# Altium PCB Electrode_PCB_v4.0.2.PcbDoc
Units mil, origin at the board's own origin, x right, y up, seen from the top; angles counter-clockwise.
Board outline 510.49 x 1258.83 mil, 2 copper layers (Top Layer, Bottom Layer), stack 34 mil thick; 24 components, 17 nets, 61 pads, 12 vias.
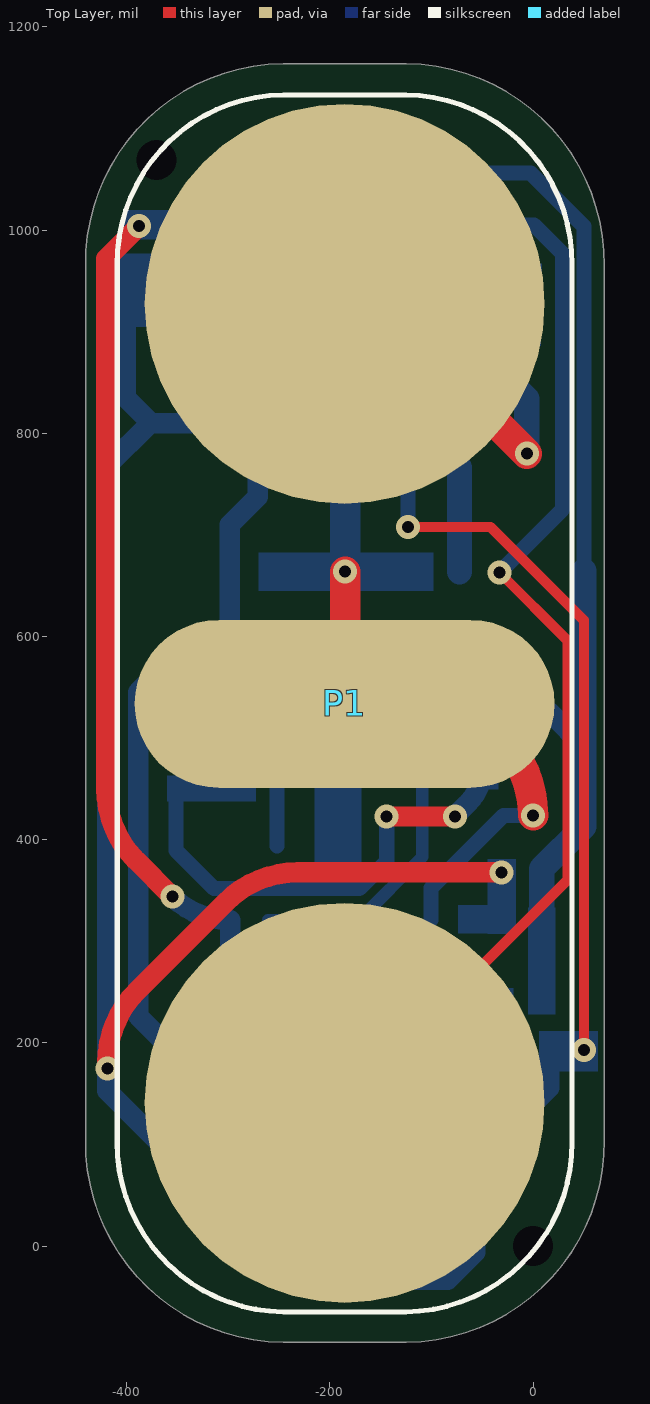
[diagram p0: Top Layer view]
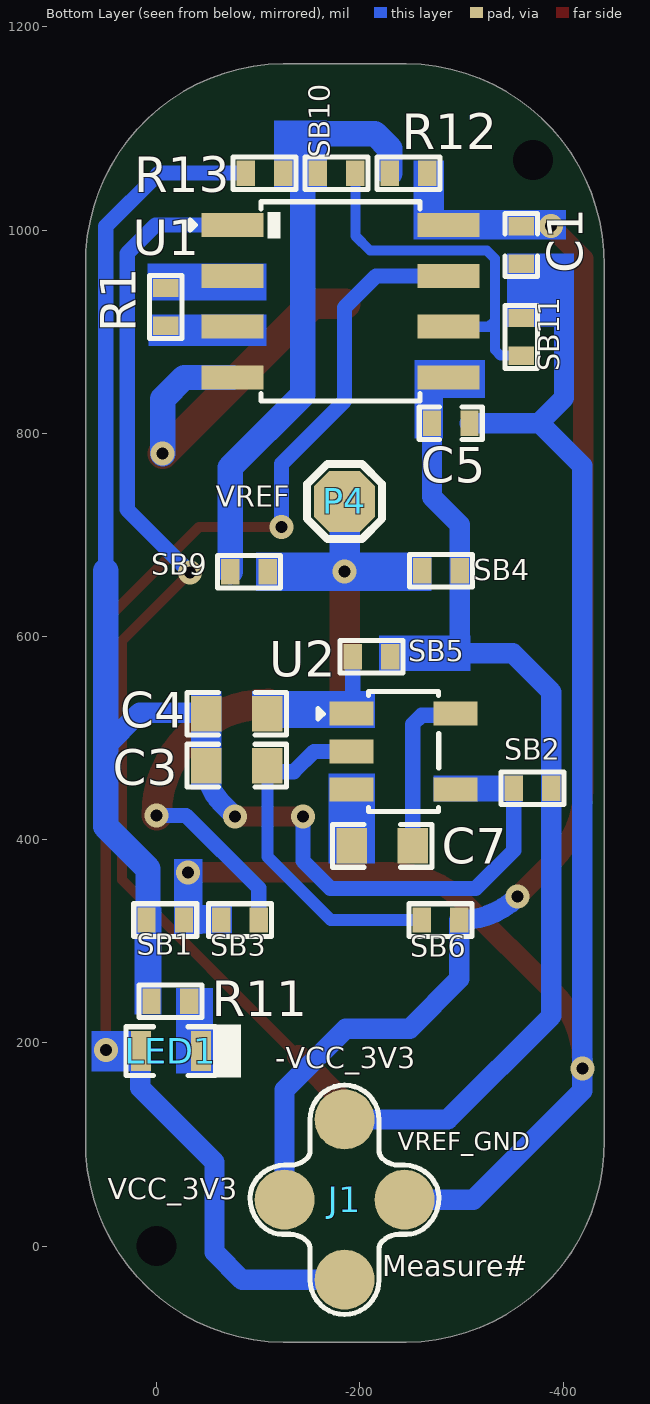
[diagram p1: Bottom Layer view, seen from below]
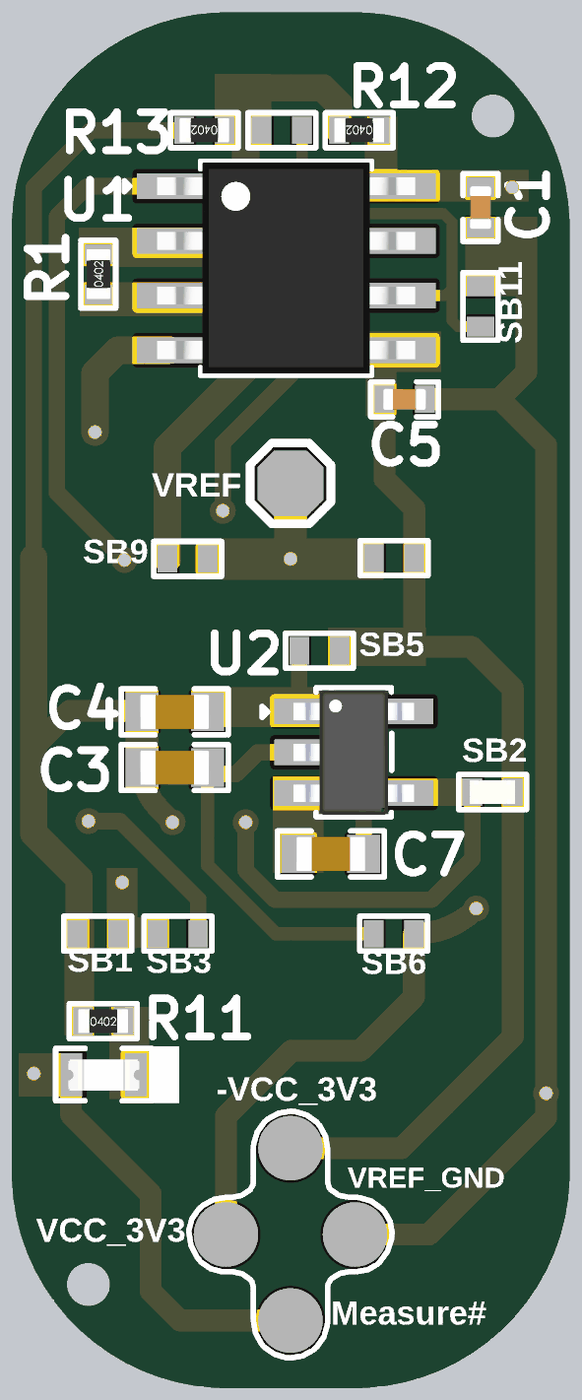
[diagram p2: 3D render of the assembled board from below, using the file's embedded part models]

## Layer stack, top to bottom
Top Solder: solder mask 3, Solder Resist, Dk 3.5
Top Layer: signal copper 9
Dielectric 1: dielectric 16, FR-4, Dk 4.8
Bottom Layer: signal copper 9
Bottom Solder: solder mask 3, Solder Resist, Dk 3.5

## Board outline
-440.49,104.27 ccw(c-243.65,102.06) -245.86,-94.78 -124.63,-94.78 ccw(c-126.84,102.06) 70,104.27 70,965 ccw(c-126.84,967.21) -124.63,1164.05 -245.86,1164.05 ccw(c-243.65,967.21) -440.49,965

## Design rules (kind name [scope] priority, off if disabled: settings)
Clearance [All] p1: gap=6 ignorepadtopadclearanceinfootprint=FALSE except(4: Arc-SMDPad Track-SMDPad SMDPad-SMDPad)
ComponentClearance [All] p1: gap=6 collisioncheckmode=3 verticalgap=6 showdistances=FALSE
HoleSize [All] p1: absolutevalues=TRUE maxlimit=1000 minlimit=1 maxpercent=80.000 minpercent=20.000
HoleToHoleClearance [All] p1: gap=0 allowstackedmicrovias=TRUE
MinimumSolderMaskSliver [All] p1: minsoldermaskwidth=0
PolygonConnect [All] p1: connectstyle=Relief reliefconductorwidth=10 reliefentries=4 polygonreliefangle="90 Angle" airgapwidth=10
RoutingVias [All] p1: holewidth=11.81 width=23.62 viastyle="Through Hole" minholewidth=11.81 minwidth=23.62 maxholewidth=31.5 maxwidth=62.99
SilkToSilkClearance [All] p1: silktosilkclearance=0
SilkToSolderMaskClearance [IsPad] p1: minsilkscreentomaskgap=0 clearancetoexposedcopper=TRUE
SolderMaskExpansion [All] p1: expansion=4 istentingtop=FALSE
UnRoutedNet [All] p1: checkbadconnections=TRUE
Width [All] p1: maxlimit=40 minlimit=6 preferedwidth=22 minimp=50.000000 maximp=50.000000 favimp=50.000000
23 further rules are at their usual default settings.

## Components (designator, comment, footprint, x,y, rotation, side; value= is the part's Value field where it differs from the comment)
C1 "1uF" Cap-0402 -359,985.5 r270 bottom locked
C3 "10uF" Cap-0603 -79,473 r180 bottom locked
C4 "10uF" Cap-0603 -79,524 r180 bottom locked
C5 "1uF" Cap-0402 -289.5,810 r180 bottom locked
C7 "10uF" Cap-0603 -222,394 r0 bottom locked
J1 "2x2 Pad" "2x2 Pad" -185,45.74 r0 bottom locked
LED1 "Orange" LED-0603 -14,192 r180 bottom locked
P1 "sEMG sensor" SEMG-SENSOR -185.49,534.27 r0 top locked
P4 "Test Point" Test-point -185,733 r0 bottom locked
R1 "240R" RES-0402 -9,924.5 r90 bottom locked
R11 "1K" RES-0402 -13.5,241 r180 bottom
R12 "150K" Res-0402 -248,1056.22 r0 bottom locked
R13 "150K" Res-0402 -106.18,1056.22 r0 bottom locked
SB1 "Solder Bridge 0402" "Solder Bridge 0402" -8.5,321 r0 bottom
SB2 "Solder Bridge 0402" "Solder Bridge 0402" -370,450.57 r0 bottom locked
SB3 "Solder Bridge 0402" "Solder Bridge 0402" -82,321 r0 bottom
SB4 "Solder Bridge 0402" "Solder Bridge 0402" -279.87,664.76 r180 bottom locked
SB5 "Solder Bridge 0402" "Solder Bridge 0402" -211.5,580 r180 bottom locked
SB6 "Solder Bridge 0402" "Solder Bridge 0402" -279.5,321 r0 bottom locked
SB9 "Solder Bridge 0402" "Solder Bridge 0402" -90.89,664 r0 bottom locked
SB10 "Solder Bridge 0402" "Solder Bridge 0402" -177.09,1056.22 r180 bottom locked
SB11 "Solder Bridge 0402" "Solder Bridge 0402" -359,895 r270 bottom locked
U1 "AD8221ARZ-R7" SOIC-8 -180.98,930 r180 bottom locked
U2 "SGM3207YN5G/TR" SOT-23-5 -243,487 r180 bottom locked

## Footprints (in the part's own frame and the unit in brackets; to place one, negate y for a bottom-side part, rotate by r counter-clockwise, add the part's x,y. Pads: shape width x height; smd on the part's side, far side on the other; paste and mask are expansions set on the pad)
"2x2 Pad" [mm]
  round 1.5 smd paste+0 mask+0.055: 1(-1.5,0) 2(0,-2.007) 3(1.5,0) 4(0,2)
  silkscreen extent -2.36,-2.87 2.36,2.87
Cap-0402 [mil]
  rect 18x25 smd mask+2.36: 1(-18.5,0) 2(18.5,0)
  silkscreen extent -31,-16 31,16, body extent -20,-10 20,10, height 19
Cap-0603 [mil]
  rect 30x35 smd mask+2.36: 1(-30,0) 2(30,0)
  silkscreen extent -49,-21 49,21, body extent -32,-16 31,16, height 34
LED-0603 [mm]
  rect 0.5x1 smd: 1(-0.75,0) 2(0.75,0)
  silkscreen extent -1.12,-0.66 1.75,0.66, body extent -0.82,-0.37 0.82,0.36, height 0.68
RES-0402 [mil]
  rect 18x25 smd mask+2.17: 1(-18.5,0) 2(18.5,0)
  silkscreen extent -32,-17 32,16, body extent -23,-11 23,11, height 16
Res-0402 [mil]
  rect 18x25 smd mask+2.17: 1(-18.5,0) 2(18.5,0)
  silkscreen extent -32,-17 32,16, body extent -23,-11 23,11, height 16
SEMG-SENSOR [mm]
  round 10 smd: 1(0,9.987) 2(0,-9.987)
  oval 10.5x4.2 smd: 3(0,-0.013)
  silkscreen extent -5.68,-15.21 5.68,15.21
SOIC-8 [mm]
  rect 1.55x0.6 smd: 1(-2.7,1.905) 2(-2.7,0.635) 3(-2.7,-0.635) 4(-2.7,-1.905) 5(2.7,-1.905) 6(2.7,-0.635) 7(2.7,0.635) 8(2.7,1.905)
  silkscreen extent -3.76,-2.49 1.99,2.49, body extent -3,-2.45 3,2.45, height 1.7
"Solder Bridge 0402" [mil]
  rect 18x25 smd mask+2.17: 1(-18.5,0) 2(18.5,0)
  silkscreen extent -32,-17 32,16
SOT-23-5 [mm]
  rect 1.1x0.6 smd: 1(-1.3,0.95) 2(-1.3,0) 3(-1.3,-0.95) 4(1.3,-0.95) 5(1.3,0.95)
  silkscreen extent -2.13,-1.5 0.88,1.5, body extent -1.4,-1.45 1.4,1.45, height 1.45
Test-point [mil]
  oct 60x60 smd: 1(0,0)
  silkscreen extent -37,-37 37,37

## Part data
C1 C5: library part CC0402KRX5R7BB105, "CAP CER 1UF 16V X5R 0402", Case Code (Imperial)=0402, Case Code (Metric)=1005, Dielectric=X5R, LCSC Part Number=C325464, MANUFACTURER=Yageo, Max Operating Temperature=85°C, Min Operating Temperature=-55°C, Supplier Part Number 1=311-1691-6-ND, Tolerance=10%, Voltage Rating=16V, Capacitance=1uF, Case/Package=0402, ComponentLink1Description=http://www.yageo.com/documents/recent/UPY-GPHC_X5R_4V-to-50V_12.pdf?src-supplier=Avnet+Europe, ComponentLink1URL=http://www.yageo.com/documents/recent/UPY-GPHC_X5R_4V-to-50V_12.pdf?src-supplier=Avnet+Europe, Composition=Ceramic, Depth=0.5mm, Halogen Free="Halogen Free", Height=0.5mm, Item Type=Capacitor, Lead Free="Lead Free", Length=1mm, Manufacturer Part Number=CC0402KRX5R7BB105, Mount="Surface Mount", Packaging="Tape and Reel", Pricing 1="1=0.36, 10=0.252, 100=0.1512, 500=0.1134, 1000=0.09576, 2500=0.09072, 5000=0.08568 (USD)", Radiation Hardening=No, Stock 1=1405667, Supplier 1=Digi-Key, Termination=SMD/SMT, Thickness=0.022inch, Voltage Rating (DC)=16V, Weight=2.3E-05oz, Width=0.02inch
C3 C4 C7: library part CL10A106MA8NRNC, "CAP CER 10UF 25V X5R 0603", Case Code (Imperial)=0603, Case Code (Metric)=1608, Dielectric=X5R, LCSC Part Number=C96446, MANUFACTURER=Samsung, Max Operating Temperature=85°C, Min Operating Temperature=-55°C, Package Quantity=1, Tolerance=20%, Voltage Rating=25V, Capacitance=10uF, Case/Package=0603, Category="Ceramic Capacitors", ComponentLink1Description=https://datasheet.ciiva.com/25766/cl10a106ma8nrnc-25766562.pdf?src-supplier=Digi-Key, ComponentLink1URL=https://datasheet.ciiva.com/25766/cl10a106ma8nrnc-25766562.pdf?src-supplier=Digi-Key, Construction=Flat, Contact Plating=Tin, Lead Free="Lead Free", Length=0.063inch, Manufacturer Part Number=CL10A106MA8NRNC, Mount="Surface Mount", Packaging="Tape and Reel", Pricing 1="4000=0.03753, 8000=0.03700, 16000=0.03595, 24000=0.03515, 32000=0.03383, 40000=0.03304, 400000=0.03225 (USD)", RoHS=Yes, RoHS Compliant=Yes, Series=CL, Supplier 1=Avnet, Supplier Part Number 1=CL10A106MA8NRNC, Termination=Wraparound, Thickness=0.035inch, Width=0.031inch
J1: "Wire Connecting Pad"
LED1: library part 19-217/S2C-AQ1R1B/3T, "0603(H=0.4mm) λD=600.5~612.5nm VR=5V VF=1.7V~2.2V IF=25mA PD=60mW", LCSC Part Number=C146215, MANUFACTURER=Everlight, Supplier Part Number 1=1080-19-217/S2C-AQ1R1B/3TTR-ND, Category=LEDs, ComponentLink1Description=LCSC, ComponentLink1URL=https://www.lcsc.com/product-detail/Light-Emitting-Diodes-LED_Everlight-Elec-19-217-S2C-AQ1R1B-3T_C146215.html, Item Type=LED, Manufacturer Part Number=19-217/S2C-AQ1R1B/3T, RoHS=No, Supplier 1=Digi-Key
P1: library part "SEMG Sensor", "Sensor Connecting Pads"
P4: library part "TEST POINT", "Test Point ON", Item Type="TEST POINT"
R1: library part RC0402FR-07240RL, "RES 240 OHM 1% 1/16W 0402", Case Code (Imperial)=0402, Case Code (Metric)=1005, MANUFACTURER=Yageo, Max Operating Temperature=155°C, Max Power Dissipation=63mW, Min Operating Temperature=-55°C, Package Quantity=1, Resistance Tolerance=1%, Resistor Type="Thick Film", Supplier Part Number 1=603-RC0402FR-07240RL, Temperature Coefficient=100ppm/°C, Voltage Rating=50V, Case/Package=0402, Category="Chip SMD Resistors", ComponentLink1Description=https://datasheet.ciiva.com/7849/1018594-7849915.pdf?src-supplier=Element14, ComponentLink1URL=https://datasheet.ciiva.com/7849/1018594-7849915.pdf?src-supplier=Element14, ComponentLink2Description=https://datasheet.ciiva.com/7849/1018594-7849916.pdf?src-supplier=Element14, ComponentLink2URL=https://datasheet.ciiva.com/7849/1018594-7849916.pdf?src-supplier=Element14, ComponentLink3Description=https://datasheet.ciiva.com/2519/pyu-r-int-thick-7-2519157.pdf?src-supplier=Digi-Key, ComponentLink3URL=https://datasheet.ciiva.com/2519/pyu-r-int-thick-7-2519157.pdf?src-supplier=Digi-Key, ComponentLink4Description=https://datasheet.ciiva.com/2519/pyu-r-int-thick-7-2519158.pdf?src-supplier=Digi-Key, ComponentLink4URL=https://datasheet.ciiva.com/2519/pyu-r-int-thick-7-2519158.pdf?src-supplier=Digi-Key, ComponentLink5Description=https://datasheet.ciiva.com/2519/pyu-r-int-thick-7-2519156.pdf?src-supplier=Digi-Key, ComponentLink5URL=https://datasheet.ciiva.com/2519/pyu-r-int-thick-7-2519156.pdf?src-supplier=Digi-Key, ComponentLink6Description=https://datasheet.ciiva.com/12669/pyu-rc0402-51-rohs-l-6-r-12669689.pdf?src-supplier=Mouser, ComponentLink6URL=https://datasheet.ciiva.com/12669/pyu-rc0402-51-rohs-l-6-r-12669689.pdf?src-supplier=Mouser, ComponentLink7Description=https://datasheet.ciiva.com/17419/pyu-rc0402-51-rohs-l-6-r-17419482.pdf?src-supplier=Future+Electronics, ComponentLink7URL=https://datasheet.ciiva.com/17419/pyu-rc0402-51-rohs-l-6-r-17419482.pdf?src-supplier=Future+Electronics, Construction=Rectangular, Depth=0.5mm, Features="Moisture Resistant", Height=0.016inch, Lead Free="Lead Free", Length=1mm, Manufacturer Part Number=RC0402FR-07240RL, Military Standard=Not, Number of Terminations=2, Packaging="Tape and Reel", Power Rating=63mW, Pricing 1="1=0.10000, 10=0.01200, 50=0.01200, 100=0.00500, 1000=0.00300, 10000=0.00100 (USD)", REACH SVHC=Unknown, Resistance=240R, RoHS=Yes, RoHS Compliant=Yes, Series=RC, Size Code=0402, Stock 1=1903202, Supplier 1=Mouser, Termination=SMD/SMT, Tolerance=1%, Voltage Rating (DC)=50V, Width=0.02inch
R11: library part RC0402JR-071KL, "RES 1K OHM 5% 1/16W 0402", Case Code (Imperial)=0402, Case Code (Metric)=1005, LCSC Part Number=C105637, MANUFACTURER=Yageo, Max Operating Temperature=155°C, Max Power Dissipation=63mW, Min Operating Temperature=-55°C, Package Quantity=1, Power Rating=62.5mW, Resistance=1kR, Resistance Tolerance=5%, Resistor Type="Thick Film", Supplier Part Number 1=311-1.0KJRCT-ND, Temperature Coefficient=100ppm/°C, Voltage Rating=50V, Case/Package=0402, Category="Chip SMD Resistors", ComponentLink1Description=https://datasheet.ciiva.com/7983/1018594-7983558.pdf?src-supplier=Element14, ComponentLink1URL=https://datasheet.ciiva.com/7983/1018594-7983558.pdf?src-supplier=Element14, ComponentLink2Description=https://datasheet.ciiva.com/2452/pyu-r-int-thick-7-2452756.pdf?src-supplier=Digi-Key, ComponentLink2URL=https://datasheet.ciiva.com/2452/pyu-r-int-thick-7-2452756.pdf?src-supplier=Digi-Key, ComponentLink3Description=https://datasheet.ciiva.com/2452/pyu-r-int-thick-7-2452757.pdf?src-supplier=Digi-Key, ComponentLink3URL=https://datasheet.ciiva.com/2452/pyu-r-int-thick-7-2452757.pdf?src-supplier=Digi-Key, ComponentLink4Description=https://datasheet.ciiva.com/2452/pyu-r-int-thick-7-2452755.pdf?src-supplier=Digi-Key, ComponentLink4URL=https://datasheet.ciiva.com/2452/pyu-r-int-thick-7-2452755.pdf?src-supplier=Digi-Key, ComponentLink5Description=https://datasheet.ciiva.com/7850/1018594-7850170.pdf?src-supplier=Element14, ComponentLink5URL=https://datasheet.ciiva.com/7850/1018594-7850170.pdf?src-supplier=Element14, ComponentLink6Description=https://datasheet.ciiva.com/7850/1018594-7850171.pdf?src-supplier=Element14, ComponentLink6URL=https://datasheet.ciiva.com/7850/1018594-7850171.pdf?src-supplier=Element14, ComponentLink7Description=https://datasheet.ciiva.com/17081/pyu-rc0402-51-rohs-l-6-r-17081438.pdf?src-supplier=Future+Electronics, ComponentLink7URL=https://datasheet.ciiva.com/17081/pyu-rc0402-51-rohs-l-6-r-17081438.pdf?src-supplier=Future+Electronics, Construction=Rectangular, Depth=0.5mm, Features="Moisture Resistant", Height=0.016inch, Item Type=Resistor, Lead Free="Lead Free", Length=0.039inch, Manufacturer Part Number=RC0402JR-071KL, Military Standard=Not, Number of Terminations=2, Packaging="Tape and Reel", Pricing 1="1=0.10000, 10=0.01300, 100=0.00540, 1000=0.00244, 2500=0.00212, 5000=0.00175 (USD)", REACH SVHC="No SVHC", RoHS=Yes, RoHS Compliant=Yes, Series=RC, Size Code=0402, Stock 1=452315, Supplier 1=Digi-Key, Termination=SMD/SMT, Tolerance=5%, Width=0.02inch
R12 R13: library part RC0402JR-07150KL, "RES SMD 0402 150kOhm 5% Paper T/R", Case Code (Imperial)=0402, Case Code (Metric)=1005, LCSC Part Number=C137919, MANUFACTURER=Yageo, Max Operating Temperature=155°C, Max Power Dissipation=63mW, Min Operating Temperature=-55°C, Package Quantity=1, Resistance=150kR, Resistance Tolerance=5%, Resistor Type="Thick Film", Temperature Coefficient=100ppm/°C, Voltage Rating=50V, Case/Package=0402, Category="Chip SMD Resistors", ComponentLink1Description=https://datasheet.ciiva.com/7983/1018594-7983551.pdf?src-supplier=Element14, ComponentLink1URL=https://datasheet.ciiva.com/7983/1018594-7983551.pdf?src-supplier=Element14, ComponentLink2Description=https://datasheet.ciiva.com/2518/pyu-r-int-thick-7-2518929.pdf?src-supplier=Digi-Key, ComponentLink2URL=https://datasheet.ciiva.com/2518/pyu-r-int-thick-7-2518929.pdf?src-supplier=Digi-Key, ComponentLink3Description=https://datasheet.ciiva.com/2518/pyu-r-int-thick-7-2518930.pdf?src-supplier=Digi-Key, ComponentLink3URL=https://datasheet.ciiva.com/2518/pyu-r-int-thick-7-2518930.pdf?src-supplier=Digi-Key, ComponentLink4Description=https://datasheet.ciiva.com/2518/pyu-r-int-thick-7-2518928.pdf?src-supplier=Digi-Key, ComponentLink4URL=https://datasheet.ciiva.com/2518/pyu-r-int-thick-7-2518928.pdf?src-supplier=Digi-Key, ComponentLink5Description=https://datasheet.ciiva.com/7850/1018594-7850149.pdf?src-supplier=Element14, ComponentLink5URL=https://datasheet.ciiva.com/7850/1018594-7850149.pdf?src-supplier=Element14, ComponentLink6Description=https://datasheet.ciiva.com/17072/pyu-rc0402-51-rohs-l-6-r-17072379.pdf?src-supplier=Future+Electronics, ComponentLink6URL=https://datasheet.ciiva.com/17072/pyu-rc0402-51-rohs-l-6-r-17072379.pdf?src-supplier=Future+Electronics, ComponentLink7Description=https://datasheet.ciiva.com/15189/getdatasheetpartid-251830-15189543.pdf?src-supplier=Verical, ComponentLink7URL=https://datasheet.ciiva.com/15189/getdatasheetpartid-251830-15189543.pdf?src-supplier=Verical, Construction=Rectangular, Depth=0.5mm, Features="Moisture Resistant", Height=0.016inch, Item Type=Resistor, Lead Free="Lead Free", Length=1mm, Manufacturer Part Number=RC0402JR-07150KL, Military Standard=Not, Number of Terminations=2, Packaging="Tape and Reel", Power Rating=63mW, Pricing 1="10000=0.00100 (USD)", REACH SVHC="No SVHC", RoHS=Yes, RoHS Compliant=Yes, Series=RC, Size Code=0402, Stock 1=170000, Supplier 1="Arrow Electronics", Supplier Part Number 1=RC0402JR-07150KL, Termination=SMD/SMT, Tolerance=5%, Weight=2.3E-05oz, Width=0.02inch
SB1 SB2 SB3 SB4 SB5 SB6 SB9 SB10 SB11: "Solder Bridge ON"
  SB5 SB6 SB9 SB10 SB11: Item Type="Solder Bridge", Manufacturer Part Number="Solder Bridge 0402"
U1: "IC OPAMP INSTR 825KHZ 8SOIC", Case/Package=SOIC, Input Bias Current=1.5nA, Input Offset Voltage (Vos)=60uV, Input Resistance=100GR, LCSC Part Number=C13342, MANUFACTURER="Analog Devices", Max Dual Supply Voltage=18V, Max Operating Temperature=85°C, Max Power Dissipation=200mW, Min Dual Supply Voltage=2.3V, Min Operating Temperature=-40°C, Nominal Supply Current=1mA, Operating Supply Voltage=36V, Output Current per Channel=18mA, Package Quantity=1000, Power Supply Rejection Ratio (PSRR)=130dB, Quiescent Current=900uA, Supplier Part Number 1=584-AD8221ARZ-R7, Voltage Gain=60dB, -3db Bandwidth=825kHz, Bandwidth=562kHz, Category="Amplifiers - Op Amps, Buffer, Instrumentation", Common Mode Rejection Ratio=80dB, ComponentLink1Description=https://datasheet.ciiva.com/15128/getdatasheetpartid-313520-15128733.pdf?src-supplier=Verical, ComponentLink1URL=https://datasheet.ciiva.com/15128/getdatasheetpartid-313520-15128733.pdf?src-supplier=Verical, ComponentLink2Description=https://datasheet.ciiva.com/2975/ad8221-2975658.pdf?src-supplier=Avnet, ComponentLink2URL=https://datasheet.ciiva.com/2975/ad8221-2975658.pdf?src-supplier=Avnet, ComponentLink3Description=https://datasheet.ciiva.com/2975/ad8221-2975980.pdf?src-supplier=Avnet, ComponentLink3URL=https://datasheet.ciiva.com/2975/ad8221-2975980.pdf?src-supplier=Avnet, ComponentLink4Description=https://datasheet.ciiva.com/6628/ad8221-6628618.pdf?src-supplier=Digi-Key, ComponentLink4URL=https://datasheet.ciiva.com/6628/ad8221-6628618.pdf?src-supplier=Digi-Key, ComponentLink5Description=https://datasheet.ciiva.com/6628/ad8221-6628619.pdf?src-supplier=Digi-Key, ComponentLink5URL=https://datasheet.ciiva.com/6628/ad8221-6628619.pdf?src-supplier=Digi-Key, ComponentLink6Description=https://datasheet.ciiva.com/6628/ad8221-6628617.pdf?src-supplier=Digi-Key, ComponentLink6URL=https://datasheet.ciiva.com/6628/ad8221-6628617.pdf?src-supplier=Digi-Key, ComponentLink7Description=https://datasheet.ciiva.com/48709/001249009-da-01-en-ic-amp-inst-prec-ad8221arz-r7-soic-8-adi-48709526.pdf?src-supplier=Conrad, ComponentLink7URL=https://datasheet.ciiva.com/48709/001249009-da-01-en-ic-amp-inst-prec-ad8221arz-r7-soic-8-adi-48709526.pdf?src-supplier=Conrad, Contact Plating=Tin,Matte, Item Type=IC, Lead Free="Contains Lead", Manufacturer Part Number=AD8221ARZ-R7, Number of Channels=1, Number of Circuits=1, Number of Elements=1, Number of Pins=8, Operating Supply Current=1mA, Packaging="Tape and Reel", Power Dissipation=200mW, Pricing 1="1=7.37000, 10=6.66000, 25=6.35000, 50=6.35000, 100=5.51000, 250=5.27000, 500=4.80000, 1000=4.37000, 10000=4.37000 (USD)", Radiation Hardening=No, RoHS=Yes, RoHS Compliant=Yes, Series=-, Slew Rate=2.5V/µs, Supplier 1=Mouser, Supply Current=1mA
U2: "NO Charge pump 1 -5.5V~-1.4V 1.4V~5.5V 60mA 19kHz SOT-23-5 DC-DC Converters ROHS", LCSC Part Number=C80403, MANUFACTURER="SG Micro", Category=Uncategorized, Item Type=IC, Manufacturer Part Number=SGM3207YN5G/TR, Pricing 1="3000=0.38750, 6000=0.36250, 12000=0.33750, 18000=0.32500, 24000=0.31250, 30000=0.31250, 300000=0.30500 (USD)", RoHS=No, Supplier 1=Avnet, Supplier Part Number 1=SGM3207YN5G/TR

## Free pads (board coordinates)
  round 0 hole 39.37 unplated: MH1(-370.49,1069.27) MH2(0,0)

## Via types
v1: diameter 23.62, hole 11.81, Top Layer to Bottom Layer, tented both sides, 12 vias

## Nets (pads, with @x,y where several pads share a name; then routed paths per layer and width w, separated by ;. In a path a pad name is that pad's centre, name@x,y a point inside that pad or via, vN(x,y) a via of type N, cw(c..) or ccw(c..) an arc to the next point about the centre after c; other vN are vias at no path point)
#rg: R1.2 U1.2
*rg: R1.1 U1.3
-VCC_3V3: C5.1 J1.2 SB2.1 SB4.2 SB5.2 U1.5 | length 980.2
  Bottom Layer w20: -298.37,580 -298.37,663.7 -298.37,710.09 -271,737.46 C5.1 ; -263.97,580 SB5.2 ; -263.97,583.5 -298.37,583.5 -350.5,583.5 -388.5,545.5 SB2.1 -388.5,265.5 -388.5,226.5 -286.74,124.74 J1.2
CAP+: C7.1 U2.5 | length 166.3
  Bottom Layer w15: U2.5 -292.29,522.51 -260.79,522.51 -252,513.72 C7.1
CAP-: C7.2 U2.3
END: P1.1 U1.4 | length 371.9
  Top Layer w30: P1.1 -153.46,927.46 v1(-6,780)
  Bottom Layer w25: U1.4 -27,855 -6,834 v1(-6,780)
GND: C3.1 C4.1 R11.1 R13.2 SB1.2 SB2.2 U2.4 | length 1674.4
  Top Layer w20: v1(-144,423) v1(-77,423)
  Bottom Layer w10: SB2.2 SB2.2@-351,450.07
  Bottom Layer w15: SB2.2 -351.5,389.5 -314,352 -171,352 -144,379 v1(-144,423) ; R13.2 -2.35,1056.22 -1.1,1054.97 50.12,1003.75 50.12,491.75 ; v1(-77,423) v1@-75.35,424.65 ; C3.1@-56.5,457 -49,464.5 C3.1@-49,467 ; C4.1@-49,529 C4.1@-47.75,527.75 ; 8,285.5 8,292.5
  Bottom Layer w20: v1@-75.35,424.65 -64.55,435.45 ccw(c-102.11,473) -49.83,463.67 ccw(c-102.11,473) C3.1 ; C4.1 -48,525 16.87,525 50.12,491.75
  Bottom Layer w25: 8.5,280.75 8.5,371.5 50.12,413.12 50.12,491.75 50.12,664.88
Measure#: J1.4 LED1.1 U1.7 | length 1370.6
  Top Layer w10: v1(-123,708) -42,708 50,616 v1(50,193)
  Bottom Layer w15: U1.7 -216,955.01 -185,924.01 -185,832.01 ; -185,844.3 -185,832.01 ; v1(-123,708) -123,770.01 -185,832.01
  Bottom Layer w20: J1.4 -84,-33 -57,-6 -57,82.79 16,155.79 LED1.1@16,192
MID: P1.2 U1.1 | length 1095.6
  Top Layer w10: P1.2@-139.56,187 34,360.56 34,596 v1(-33,663)
  Top Layer w22: P1.2 P1.2@-139.56,187
  Bottom Layer w15: U1.1 1,1005 29,977 29,725 v1(-33,663)
NetC3_2: C3.2 SB6.2 U2.2 | length 352.6
  Bottom Layer w12: SB6.2 -171.37,321 -109,383.37 -109,430 C3.2@-109,467
  Bottom Layer w15: U2.2 -155,487 -135,467 C3.2@-109,467
NetC4_2: C4.2 SB5.1 U2.1 | length 56.1
  Bottom Layer w6: U2.1@-193,525.58 U2.1
  Bottom Layer w15: U2.1@-193,525.58 SB5.1
NetLED1_2: LED1.2 R11.2 | length 41
  Bottom Layer w15: LED1.2 -43.53,232.97
NetSB10_2: SB10.2 SB11.2 U1.6 | length 375
  Bottom Layer w10: SB11.2 -338.5,876.5 -333,882 -333,911 ; U1.6 -327,905 -333,911 ; SB10.2 -195.59,994.41 -210,980 -246.98,980 -325,980 -333,972 -333,911
VCC/2: R12.2 R13.1 SB9.2 SB10.1 | length 519.8
  Bottom Layer w25: R12.2 -229.5,1080.36 -214.86,1095 -160.06,1095 ; -144,1054.5 -144,838 -72.39,766.39 SB9.2
VCC_3V3: C1.1 J1.3 R12.1 SB6.1 U1.8 | length 1161.6
  Top Layer w20: v1(-388,1004) -420,972 -420,450.42 ccw(c-320,450.42) -390.71,379.71 v1(-355,344)
  Bottom Layer w6: U1.8@-305.98,1005 U1.8 U1.8@-287,1005.28
  Bottom Layer w20: v1(-355,344) ccw(c-299.47,399.53) -299.47,321 SB6.1 -298,263 -249,214 -186,214 -125.94,153.94 J1.3
VREF: P1.3 P4.1 SB3.1 SB4.1 SB9.1 | length 761.9
  Top Layer w15: P1.3 P1.3@-185,534.25
  Top Layer w25: P1.3 P1.3@-109.76,533.76
  Top Layer w30: P1.3@-185,534.25 v1(-185,664) ; P1.3@-109.76,533.76 cw(c-109.76,424) v1(0,424)
  Bottom Layer w6: SB4.1 SB4.1@-260.61,664 ; -124.47,664 -124.17,663.7
  Bottom Layer w15: SB4.1@-260.61,664 v1(-185,664) -124.47,664 SB9.1 ; SB3.1 -100.5,352.5 -29,424 v1(0,424)
  Bottom Layer w30: v1(-185,664) P4.1
VREF_GND: C1.2 C5.2 J1.1 SB1.1 SB3.2 SB11.1 | length 1615.3
  Top Layer w20: v1(-419,175) -419,180.58 cw(c-319,180.58) -389.71,251.29 -302.29,338.71 cw(c-231.58,268) -231.58,368 v1(-31,368)
  Bottom Layer w20: -419,595.37 -419,620 ; -401,910 -401,834.98 -377,810.98 -377,810 ; -400,918.75 -378,940.75 ; C5.2 -377,810 ; J1.1 -311.74,45.74 -419,153 -419,620 ; -419,620 -419,768 -377,810

## Other copper
Bottom Layer:
  region net -VCC_3V3: -219.09,601 -308.85,601 -308.85,566 -219.09,566
  rectangle net -VCC_3V3: -282,795 -254,866.81
  region net VCC/2: -115.68,1038.85 -115.68,1108 -167.59,1108 -167.59,1038.85
  rectangle net VREF: -270.37,645 -98,682.57
  rectangle net VCC/2: -167.59,1042 -115.68,1070.72
  rectangle net VCC_3V3: -283,991 -253,1068.72
  region net VREF_GND: -17,307.5 -17,381 -45,381 -45,307.5
  rectangle net NetLED1_2: -55.71,169.76 -19,254
  rectangle net Measure#: 5.69,172 64,211.69
  rectangle net GND: -360.5,437.79 -272.53,463.07
  rectangle net VREF_GND: -74,308 -18,336
  rectangle net GND: -5,228 22,333.5
  rectangle net VREF_GND: -411,904.5 -346,977
  rectangle net CAP-: -215,376.5 -169,465
  rectangle net -VCC_3V3: -323,835 -254,872
  rectangle net -VCC_3V3: -317.79,843.19 -256.77,866.81
  rectangle net VREF_GND: -374,904.5 -345,977
  rectangle net VCC_3V3: -403,991 -256.77,1020
  rectangle net *rg: -107.98,886 8,917
  rectangle net #rg: -107.98,931 9,967
  rectangle net GND: -64,449.5 -34,546.5
  rectangle net NetC4_2: -215,510 -94,546.5

## Silkscreen, mask and mechanical layers (free items; w line width, h text height)
Bottom Overlay:
  text "VREF" at -58,721 h35
  text "-VCC_3V3" at -117,168.17 h35
  text "VREF_GND" at -237.36,88.69 h30
  text "VCC_3V3" at 48,39.17 h35
  text "Measure#" at -222,-36.59 h35
Board Outline:
  lines w5: -272.49,-92.67 -272.26,-92.44
  lines w10: -440.49,104.27 ccw(c-243.65,102.06) -245.86,-94.78 -124.63,-94.78 ccw(c-126.84,102.06) 70,104.27 70,965 ccw(c-126.84,967.21) -124.63,1164.05 -245.86,1164.05 ccw(c-243.65,967.21) -440.49,965 ; -440.49,104.27 -440.49,965 ; -440.49,104.27 -440.49,965
Fabrication:
  drawing of 191 lines, arcs and shapes, not listed
  text "Layer" at 1196.34,615 h60
  text "Name" at 1606.26,615 h60
  text "Material" at 2536,615 h60
  text "Thickness" at 3395.77,615 h60
  text "Constant" at 4045.6,615 h60
  text "Board Layer Stack" at 4615.46,615 h60
  text "Top Overlay" at 1606.26,495 h60
  text "Top Solder" at 1606.26,375 h60
  text "Solder Resist" at 2536,375 h60
  text "3.00mil" at 3395.77,375 h60
  text "3.5" at 4045.6,375 h60
  text "1" at 1196.34,255 h60
  text "Top Layer" at 1606.26,255 h60
  text "9.00mil" at 3395.77,255 h60
  text "Dielectric 1" at 1606.26,135 h60
  text "FR-4" at 2536,135 h60
  text "16.00mil" at 3395.77,135 h60
  text "4.8" at 4045.6,135 h60
  text "2" at 1196.34,15 h60
  text "Bottom Layer" at 1606.26,15 h60
  text "9.00mil" at 3395.77,15 h60
  text "Bottom Solder" at 1606.26,-105 h60
  text "Solder Resist" at 2536,-105 h60
  text "3.00mil" at 3395.77,-105 h60
  text "3.5" at 4045.6,-105 h60
  text "Bottom Overlay" at 1606.26,-225 h60
  text "Total board thickness:" at 1196.34,-345 h60
  text "40.00mil" at 3395.77,-345 h60
Drill Drawing:
  lines w10: 1177.92,1088.67 1194.58,1088.67 1211.25,1072 1227.92,1088.67 1244.58,1088.67 1227.92,1105.33 1244.58,1122 1227.92,1122 1211.25,1138.67 1194.58,1122 1177.92,1122 1194.58,1105.33 1177.92,1088.67 ; 1177.92,1222 1244.58,1222 1244.58,1288.67 1177.92,1288.67 1177.92,1222
  lines w15: 1118.12,1027 8158.22,1027 ; 1118.12,1327 8158.22,1327 ; 1669,877 1669,1477 ; 2198.86,877 2198.86,1477 ; 3288.55,877 3288.55,1477 ; 3794.42,877 3794.42,1477 ; 4528.22,877 4528.22,1477 ; 6027.78,877 6027.78,1477 ; 6617.62,877 6617.62,1477 ; 7363.42,877 7363.42,1477 ; 1118.12,877 8158.22,877 8158.22,1477 1118.12,1477 1118.12,877
  text "Symbol" at 1208.12,1372 h72
  text "Count" at 1714,1372 h72
  text "Hole Size" at 2243.86,1372 h72
  text "Plated" at 3333.55,1372 h72
  text "Hole Type" at 3839.42,1372 h72
  text "Drill Layer Pair" at 4573.22,1372 h72
  text "Via/Pad" at 6072.78,1372 h72
  text "Pad Shape" at 6662.62,1372 h72
  text "Template" at 7408.42,1372 h72
  text "12" at 1714,1222 h60
  text "0.300mm (11.81mil)" at 2243.86,1222 h60
  text "PTH" at 3333.55,1222 h60
  text "Round" at 3839.42,1222 h60
  text "Top Layer - Bottom Layer" at 4573.22,1222 h60
  text "Via" at 6072.78,1222 h60
  text "Rounded" at 6662.62,1222 h60
  text "v60h30m0mx0" at 7408.42,1222 h60
  text "2" at 1714,1072 h60
  text "1.000mm (39.37mil)" at 2243.86,1072 h60
  text "NPTH" at 3333.55,1072 h60
  text "Round" at 3839.42,1072 h60
  text "Top Layer - Bottom Layer" at 4573.22,1072 h60
  text "Pad" at 6072.78,1072 h60
  text "Rounded" at 6662.62,1072 h60
  text "c0hn100" at 7408.42,1072 h60
  text "14 Total" at 1714,922 h60

## Dimensions
70,965 to -440.49,965 on Dimension
-124.63,-94.78 to -245.86,1164.05 on Dimension
-126.84,102.06 to -126.84,102.06 on Dimension
-243.65,102.06 to -243.65,102.06 on Dimension
-126.84,967.21 to -126.84,967.21 on Dimension
-243.65,967.21 to -243.65,967.21 on Dimension
70,965 to 70,104.27 on Dimension
-440.49,965 to -440.49,104.27 on Dimension